# Altium PCB Power-PCB-v1.0.PcbDoc (part 3 of 3)
Units mil, origin at the board's own origin, x right, y up, seen from the top; angles counter-clockwise.
Board outline 5472.44 x 5472.44 mil, 2 copper layers (Top Layer, Bottom Layer), stack 61.855 mil thick; 76 components, 43 nets, 196 pads, 129 vias.
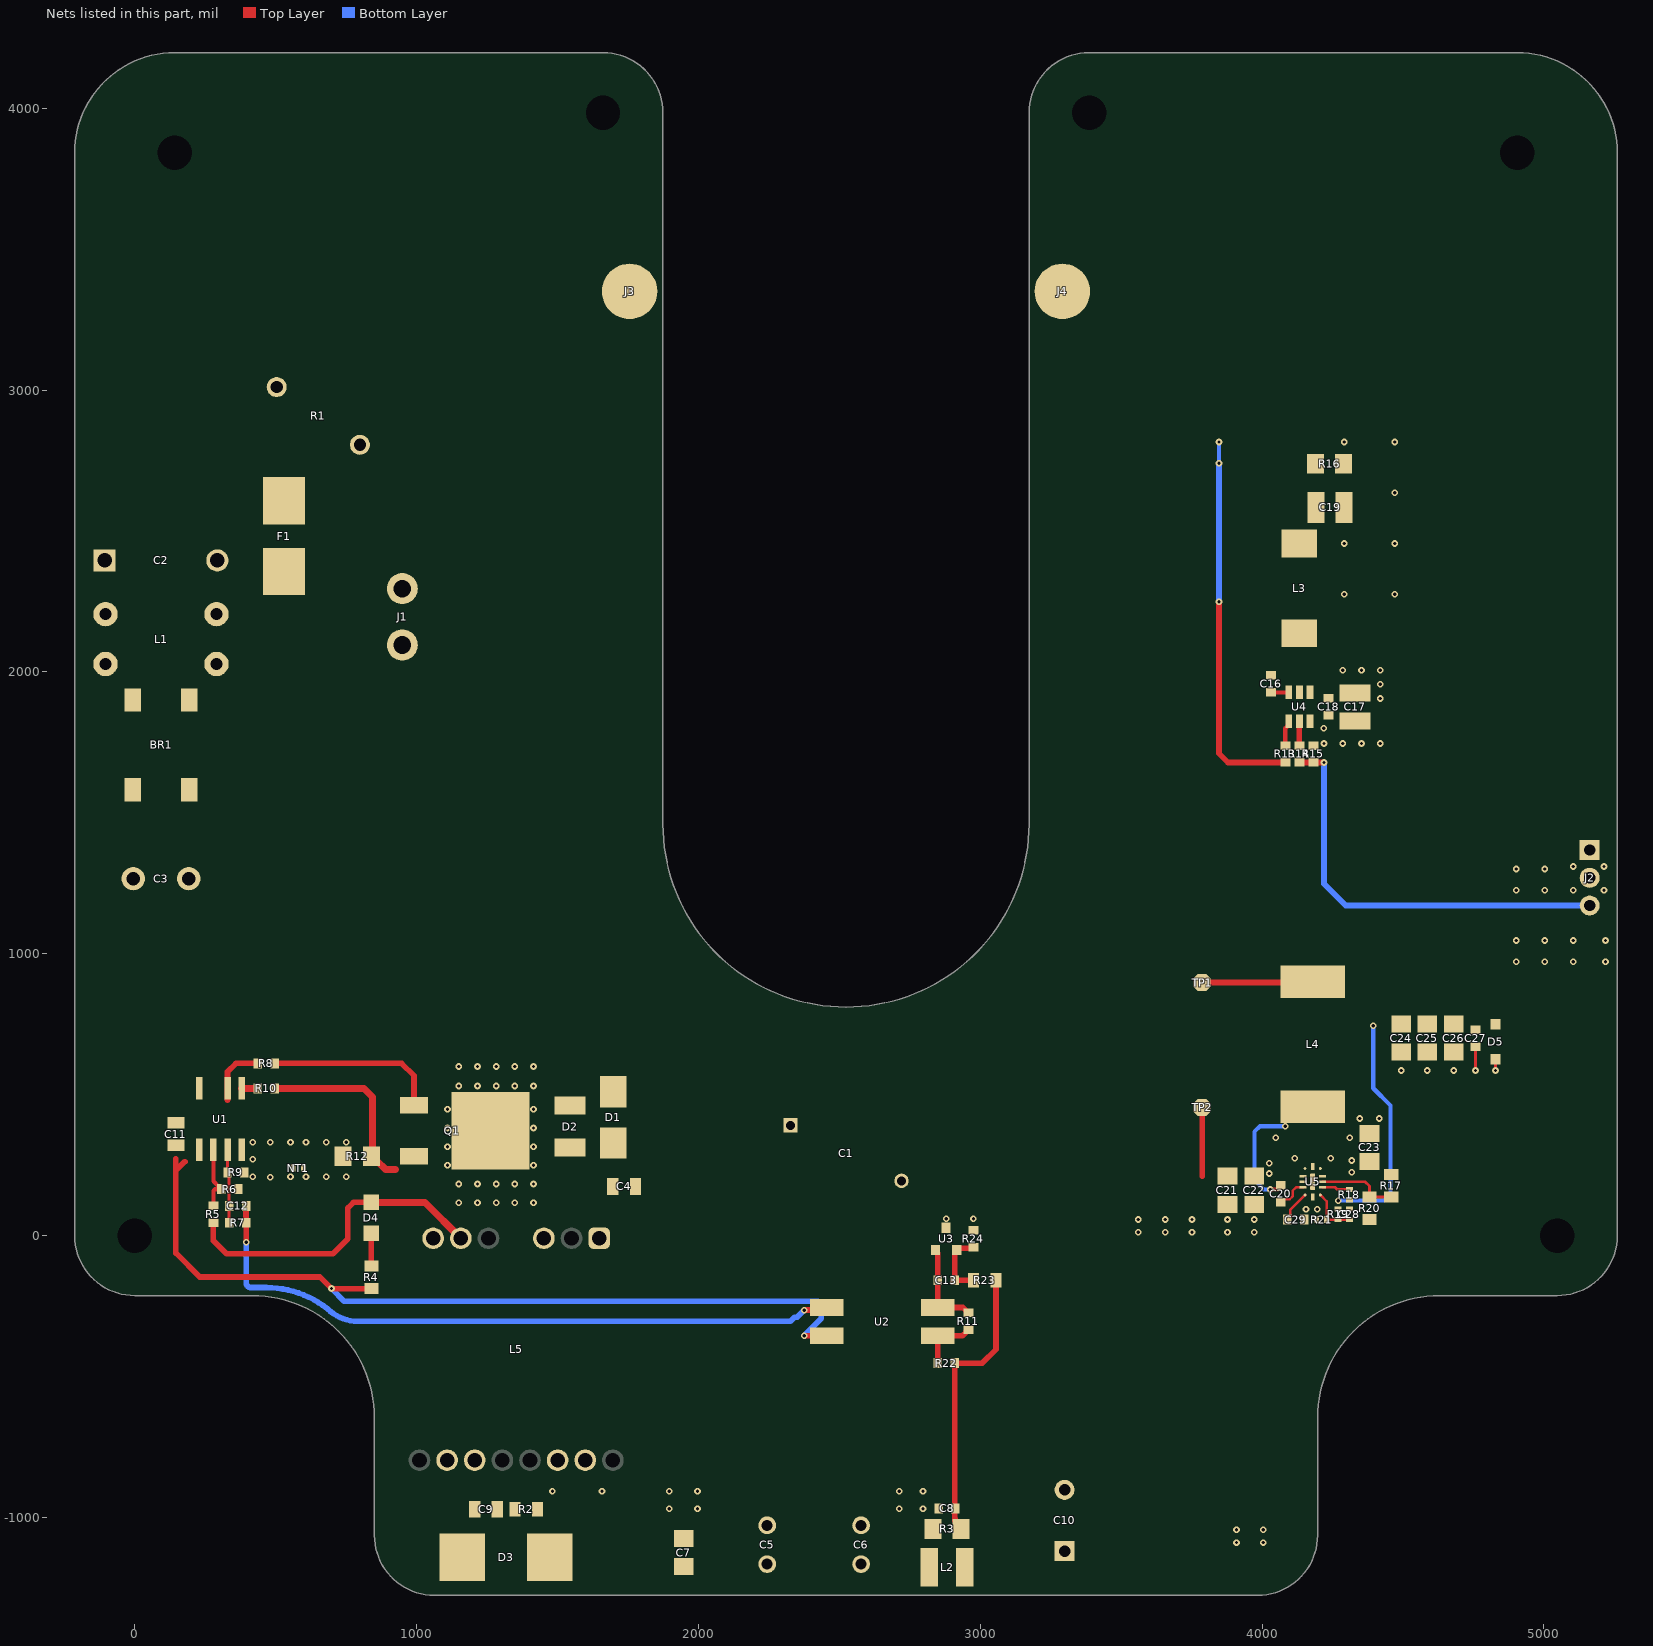
[diagram p2: the nets of this part, all layers, seen from the top]

## Part data (continued)
U1: "IC OFFLINE SWITCH FLYBACK 7SOIC", LCSC Part Number=C182073, Manufacturer="Texas Instruments", ComponentLink1Description=https://datasheet.ciiva.com/24018/slusbf3a-284800-24018902.pdf?src-supplier=Mouser, ComponentLink1URL=https://datasheet.ciiva.com/24018/slusbf3a-284800-24018902.pdf?src-supplier=Mouser, ComponentLink2Description=https://datasheet.ciiva.com/30018/ucc28740-30018278.pdf?src-supplier=Avnet, ComponentLink2URL=https://datasheet.ciiva.com/30018/ucc28740-30018278.pdf?src-supplier=Avnet, ComponentLink3Description=https://datasheet.ciiva.com/29610/ucc28740-29610346.pdf?src-supplier=Digikey, ComponentLink3URL=https://datasheet.ciiva.com/29610/ucc28740-29610346.pdf?src-supplier=Digikey, Height=1.75mm, Item Type=IC, Lead Free=5697LeadFree, Length=4.9mm, Manufacturer Part Number=UCC28740DR, Pricing="1=1.11, 10=0.8, 50=0.723, 100=0.638, 1000=0.532, 10000=0.496 (USD)", RoHS=Yes, Stock=12848, Supplier=Mouser, Thickness=1.58mm, Width=3.91mm
U2: "OPTOISOLATOR 5KV 1CH TRANS 4-SMD", Case/Package=SMD/SMT, Collector Emitter Saturation Voltage=200mV, Collector Emitter Voltage (VCEO)=35V, Current Transfer Ratio=400%, Forward Current=50mA, Forward Voltage=1.4V, Isolation Voltage=5kV, LCSC Part Number=C109227, Manufacturer="Vishay Lite-On", Max Operating Temperature=110°C, Max Power Dissipation=200mW, Min Operating Temperature=-30°C, Package Quantity=1000, Power Dissipation=70mW, Reverse Breakdown Voltage=6V, Collector-emitter Voltage-Max=200mV, ComponentLink1Description=https://datasheet.ciiva.com/12240/ltv-817-827-847-12240648.pdf?src-supplier=Mouser, ComponentLink1URL=https://datasheet.ciiva.com/12240/ltv-817-827-847-12240648.pdf?src-supplier=Mouser, ComponentLink2Description=https://datasheet.ciiva.com/2958/s-110-ltv-817m-s-s-ta-s-ta1-s-tpseries20130925-2958797.pdf?src-supplier=Digikey, ComponentLink2URL=https://datasheet.ciiva.com/2958/s-110-ltv-817m-s-s-ta-s-ta1-s-tpseries20130925-2958797.pdf?src-supplier=Digikey, Fall Time=18000ns, Input Type=DC, Isolation Voltage-Max=5kV, Item Type=Optocouplers, Lead Free="Lead Free", Manufacturer Part Number=LTV-817S-TA1-C, Max Collector Current=50mA, Max Input Current=50mA, Max Output Voltage=35V, Mounting Technology="Surface Mount", Number of Channels=1, Number of Elements=1, Output Current per Channel=50mA, Packaging="Tape and Reel", Pins=4, Pricing="1=0.5, 10=0.291, 100=0.1856, 500=0.14438 (USD)", Radiation Hardening=No, Rise Time=18000ns, RoHS=Yes, Series=-, Stock=4949, Supplier=Digikey
U3: "IC VREF SHUNT ADJ 0.5% SOT23-3", Case/Package=SOT-23-3, Cathode Current=700uA, LCSC Part Number=C2864384, Manufacturer="Texas Instruments", Max Operating Temperature=125°C, Max Output current=100mA, Max Output Voltage=36V, Max Supply Voltage=37V, Min Operating Temperature=-40°C, Min Output Voltage=2.495V, Package Quantity=250, Temperature Coefficient=92ppm/°C, Tolerance=0.5%, ComponentLink1Description=https://datasheet.ciiva.com/15148/getdatasheetpartid-48480-15148279.pdf?src-supplier=Verical, ComponentLink1URL=https://datasheet.ciiva.com/15148/getdatasheetpartid-48480-15148279.pdf?src-supplier=Verical, ComponentLink2Description=https://datasheet.ciiva.com/2012/tl431a-2012112.pdf?src-supplier=Digikey, ComponentLink2URL=https://datasheet.ciiva.com/2012/tl431a-2012112.pdf?src-supplier=Digikey, ComponentLink3Description=https://datasheet.ciiva.com/2012/tl431a-2012111.pdf?src-supplier=Digikey, ComponentLink3URL=https://datasheet.ciiva.com/2012/tl431a-2012111.pdf?src-supplier=Digikey, ComponentLink4Description=https://datasheet.ciiva.com/2012/tl431a-2012113.pdf?src-supplier=Digikey, ComponentLink4URL=https://datasheet.ciiva.com/2012/tl431a-2012113.pdf?src-supplier=Digikey, ComponentLink5Description=https://datasheet.ciiva.com/14366/tl432b-14366103.pdf?src-supplier=Avnet, ComponentLink5URL=https://datasheet.ciiva.com/14366/tl432b-14366103.pdf?src-supplier=Avnet, Item Type=IC, Lead Free="Lead Free", Manufacturer Part Number=TL431BQDBZT, Output Current=100mA, Output Type=Adjustable, Output Voltage=36V, Packaging="Tape and Reel", Pins=3, Pricing="1=0.88, 10=0.633, 50=0.57, 100=0.501, 1000=0.415, 10000=0.397 (USD)", Radiation Hardening=No, Reference Type=Shunt,Adjustable, Reference Voltage=36V, RoHS=Yes, RoHS Compliant=Yes, Series=-, Stock=34135, Supplier=Mouser, Thickness=1mm
U4: "IC LED DRV RGLTR PWM SOT23-THIN", LCSC Part Number=C2865497, Manufacturer="Texas Instruments", Height=1.1mm, Item Type=IC, Length=2.9mm, Manufacturer Part Number=TPS92200D2DDCR, Pins=6NUMBER, Pricing="1=0.59, 10=0.414, 50=0.371, 100=0.323, 1000=0.276, 10000=0.243 (USD)", RoHS=Yes, Stock=5302, Supplier=Mouser, Thickness=870um, Width=1.6mm
U5: "IC REG BUCK ADJ 4A 13WQFN", LCSC Part Number=C3187981, Manufacturer="Texas Instruments", Item Type=IC, Manufacturer Part Number=LM60440AQRPKRQ1, Pricing="1=2.79, 10=1.91, 50=1.91, 100=1.71, 1000=1.52, 10000=1.45 (USD)", RoHS=Yes, Stock=916, Supplier=Mouser

## Free pads (board coordinates)
  oval 60x0 / inner round 60 / far side oval 60x0 hole 122.05: 4(141.73,3842.52)
  round 0 / inner oval 60x0 / far side round 0 hole 122.05: 5(1661.42,3984.25)
  round 0 / inner round 60 / far side oval 60x0 hole 122.05: 6(0,0)
  round 0 / inner round 60 / far side round 0 hole 122.05: 7(3385.98,3984.25) 8(4905.08,3842.52) 9(5047.24,0)

## Via types
v1: diameter 23.62, hole 11.81, Top Layer to Bottom Layer, tented both sides, 129 vias

## Nets (pads, with @x,y where several pads share a name; then routed paths per layer and width w, separated by ;. In a path a pad name is that pad's centre, name@x,y a point inside that pad or via, vN(x,y) a via of type N, cw(c..) or ccw(c..) an arc to the next point about the centre after c; other vN are vias at no path point)
5V: C24.2 C25.2 C26.2 C27.2 C28.2 D5.2 J2.1 L4.2 R18.1 R19.2 TP1.1 | length 1207.1
  Top Layer w20: TP1.1@3787.03,898.05 L4.2@4177.33,898.05
  Bottom Layer w15: v1(4269.65,124.43) 4430.42,124.43 4455.03,149.05 4455.03,462.05 4394.03,523.05 v1(4394.03,745.05)
24V: C8.2 C10.1 C17.2 C18.2 C21.2 C22.2 C23.2 L2.2 R3.2 R17.2 R22.2 R23.2 TP2.1 U4.4 U5.2 U5.10 | length 1302.5
  Top Layer w20: R3.2@2909.03,-1010.43 R22.2@2909.03,-451.95 3007.03,-451.95 3055.68,-403.3 R23.2@3055.68,-157.95 ; 2909.03,-987.79 ccw(c2987.56,-987.79) 2932.03,-1043.31 R3.2@2913.53,-1024.81 ; 3787.03,211.05 TP2.1@3787.03,455.05
  other v1: 3561.03,12.05 3656.03,12.05 3751.03,12.05 3561.03,57.23 3656.03,57.23 3751.03,57.23 4025.01,220.43 4317.54,224.52 4025.01,256.52 4317.54,266.52 4419.03,1906.05 4419.03,1956.05 4286.03,2006.05 4352.53,2006.05 4419.03,2006.05
FB_O: C12.1 R7.1 U2.3 | length 2391.6
  Top Layer w20: C12.1@395.03,105.8 R7.1@395.03,45.8 396.03,44.8 v1(396.03,-23.61) ; v1(2375.03,-264.33) 2375.72,-263.64 2446.65,-263.64 U2.3@2455.33,-254.95
  Bottom Layer w20: v1(396.03,-23.61) 396.03,-168.38 ccw(c411.54,-168.38) 411.54,-183.89 466.75,-183.89 cw(c464.69,-541.22) 683.88,-259.01 cw(c674.66,-270.85) 685.2,-260.17 ccw(c790.93,-153.23) 790.99,-303.62 2326.37,-303.62 2340.78,-289.21 2350.16,-289.21 v1(2375.03,-264.33)
GND: C1.2 C5.2 C6.2 C7.1 C8.1 C10.2 C17.1 C18.1 C19.1 C21.1 C22.1 C23.1 C24.1 C25.1 C26.1 C27.1 C29.1 D5.1 J2.2 L5.12 L5.13 R15.2 R16.1 R20.1 R21.1 R24.1 U3.3 U4.3 U5.1 U5.6 U5.11 U5.13 | length 127.1
  Top Layer w10: C8.1@2850.46,-968.74 C8.1@2852.03,-970.31 ; v1(4757.03,586.05) C27.1@4757.03,671.05 ; v1(4828.03,586.05) D5.1@4828.03,625.89
  other v1: 3909.06,-1088.82 4004.06,-1088.82 3909.06,-1043.64 4004.06,-1043.64 1896.03,-968.74 1997.03,-968.74 2712.03,-968.74 2796.85,-968.74 1482.03,-907.06 1658.16,-907.06 1896.03,-907.06 1997.03,-907.06 2712.03,-907.06 2796.85,-907.06 3877.03,12.05 3972.03,12.05 3877.03,57.23 3972.03,57.23 2879.03,60.05 2975.68,60.05 4155.86,93.29 4195.89,93.29 4115.37,275.04 4243.59,275.05 4048.03,348.05 4310.93,348.05 4346.03,416.05 4416.03,416.05 4494.03,586.05 4586.03,586.05 4680.03,586.05 4901.44,971.76 5002.44,971.76 5103.44,971.76 5218.11,971.76 4901.44,1047.46 5002.44,1047.46 5103.44,1047.46 5218.11,1047.46 4901.44,1225.49 5002.44,1225.49 5103.94,1225.49 5213.19,1225.49 4901.44,1301.19 5002.44,1301.19 5103.94,1310.05 5213.19,1310.05 4219.53,1746.05 4286.03,1746.05 4352.53,1746.05 4419.03,1746.05 4218.53,1800.46 4290.85,2275.5 4471.03,2275.5 4290.85,2455.68 4471.03,2455.68 4471.03,2635.87 4290.85,2816.05 4471.03,2816.05
HV_DC: BR1.1 C3.1 C4.2 D1.1 L5.1 U1.7
LED_OUT_N: J4.1 R13.2 R16.2 | length 1353.6
  Top Layer w20: v1(3847.03,2249.05) 3847.03,1711.05 3879.03,1679.05 R13.2@4082.43,1679.05
  Bottom Layer w15: v1(3847.03,2741.05) v1(3847.03,2816.05)
  Bottom Layer w20: v1(3847.03,2249.05) v1(3847.03,2741.05)
LED_OUT_P: C19.2 J3.1 L3.2
Live: F1.1 J1.2
NetBR1_3: BR1.3 L1.4
NetBR1_4: BR1.4 L1.3
NetC2_1: C2.1 L1.2 R1.2
NetC2_2: C2.2 F1.2 L1.1
NetC4_1: C4.1 D1.2 D2.1
NetC5_1: C5.1 C6.1 C7.2 D3.1 L2.1 R2.2 R3.1
NetC9_1: C9.1 D3.2 L5.8 L5.9
NetC9_2: C9.2 R2.1
NetC12_2: C12.2 R7.2 R9.2 U1.3 | length 261.1
  Top Layer w10: U1.3@329.31,304.5 R9.2@329.31,224.5 335.03,218.77 C12.2@335.03,105.8 R7.2@335.03,45.8
NetC13_1: C13.1 R11.1 U2.2 U3.1 | length 326
  Top Layer w20: U3.1@2839.63,-50.69 2839.63,-52.66 2849.03,-62.06 C13.1@2849.03,-157.95 U2.2@2849.03,-254.95 2938.09,-254.95 2950.68,-267.55 2950.68,-268.95 2955.68,-273.95 R11.1@2958.18,-273.95
NetC13_2: C13.2 R23.1 R24.2 U3.2 | length 239.3
  Top Layer w20: U3.2@2914.43,-50.69 2909.03,-56.09 C13.2@2909.03,-157.95 R23.1@2975.68,-157.95 ; U3.2@2916.43,-50.69 2922.54,-44.58 2972.42,-44.58 R24.2@2975.68,-41.32
NetC16_1: C16.1 U4.6 | length 62.6
  Top Layer w15: C16.1@4032.03,1927.62 U4.6@4094.63,1927.62
NetC16_2: C16.2 L3.1 U4.5
NetC20_1: C20.1 L4.1 U5.3 U5.12 | length 404.2
  Top Layer w15: v1(4029.03,164.05) 4029.34,164.36 4056.03,164.36 4066.03,174.36 C20.1@4066.03,179.05
  Bottom Layer w15: v1(4029.03,164.05) 4006.03,164.05 3973.03,197.05 3973.03,369.05 3992.03,388.05 v1(4081.69,388.05)
NetC20_2: C20.2 U5.4 | length 112.5
  Top Layer w9: C20.2@4066.03,119.05 4076.34,129.36 4097.97,129.36 4108.16,139.55 4108.16,159.5 4120.26,171.6 4144.95,171.6 U5.4@4145.03,171.68
NetC28_1: C28.1 R19.1 R21.2 U5.7 | length 176.8
  Top Layer w9: U5.7@4206.79,144.36 4229.36,121.8 R21.2@4229.36,57.23 C28.1@4309.65,57.23
NetC29_2: C29.2 U5.5 | length 113.1
  Top Layer w9: C29.2@4089.48,57.23 4099.98,67.73 4099.98,92.18 U5.5@4152.17,144.36
NetD2_2: D2.2 L5.3 Q1.2
  other v1: 1150.09,117.11 1216.32,117.11 1282.56,117.11 1348.79,117.11 1415.03,117.11 1150.09,183.35 1216.32,183.35 1282.56,183.35 1348.79,183.35 1415.03,183.35 1110.03,249.58 1415.03,249.58 1110.03,315.82 1415.03,315.82 1110.03,382.06 1415.03,382.06 1110.03,448.29 1415.03,448.29 1150.09,531.29 1216.32,531.29 1282.56,531.29 1348.79,531.29 1415.03,531.29 1150.09,600.29 1216.32,600.29 1282.56,600.29 1348.79,600.29 1415.03,600.29
NetD4_1: D4.1 L5.5 R5.2 | length 1152.8
  Top Layer w20: R5.2@279.31,45.8 279.31,-17.92 325.6,-64.21 703.35,-64.21 756.5,-11.06 756.5,98.19 776.42,118.11 D4.1@839.44,118.11
  Top Layer w25: D4.1@839.44,118.11 1029.68,118.11 L5.5@1156.98,-9.19
NetD4_2: D4.2 R4.2 | length 115.5
  Top Layer w20: R4.2@839.44,-107.61 D4.2@839.44,7.88
NetQ1_1: Q1.1 R8.2 | length 617.6
  Top Layer w20: R8.2@496.45,611.39 947.03,611.39 990.7,567.72 Q1.1@990.7,462.49
NetQ1_3: Q1.3 R10.2 R12.2 | length 631.8
  Top Layer w25: R10.2@496.45,522.8 813.16,522.8 843.55,492.4 843.55,318.89 ; R12.2@843.55,277.55 855.82,265.28 859.67,265.28 889.41,235.55 924.76,235.55
NetR8_1: R8.1 U1.6 | length 219.5
  Top Layer w20: 329.31,481.46 U1.6@329.31,522.8 329.31,581.43 359.26,611.39 R8.1@436.45,611.39
NetR10_1: R10.1 U1.5 | length 57.1
  Top Layer w25: U1.5@379.31,522.8 R10.1@436.45,522.8
NetR11_2: R11.2 R22.1 U2.1 | length 216.3
  Top Layer w20: R22.1@2849.03,-451.95 U2.1@2849.03,-354.95 2937.18,-354.95 2950.68,-341.45 2950.68,-338.95 2955.68,-333.95 R11.2@2958.18,-333.95
NetR13_1: R13.1 U4.1 | length 90.5
  Top Layer w15: R13.1@4082.43,1739.05 4082.43,1800.46 4094.63,1812.66 U4.1@4094.63,1824.47
NetR14_2: R14.2 U4.2 | length 85.4
  Top Layer w20: R14.2@4132.03,1739.05 U4.2@4132.03,1824.47
NetR17_1: R17.1 R20.2 U5.9 | length 289.1
  Top Layer w10: U5.9@4213.93,191.36 4365.44,191.36 4381.03,175.78 R20.2@4381.03,137.23 R17.1@4458.03,137.23
NetR18_2: R18.2 U5.8 | length 98.7
  Top Layer w10: U5.8@4213.93,171.68 4258.35,171.68 4265.44,164.59 R18.2@4309.65,164.59
Neutral: J1.1 R1.1
P-SGND: C11.1 L5.6 NT1.1 R6.1 R9.1 U1.4
  other v1: 481.45,207 419.03,209.41 552.53,209.41 419.03,271.05 419.03,331.05 481.45,331.05 552.53,331.05
PGND: BR1.2 C1.1 C3.2 NT1.2 R12.1
  other v1: 607.53,209.41 679.28,209.41 751.03,209.41 607.53,331.05 679.28,331.05 751.03,331.05
PWM_CTRL: J2.3 R14.1 R15.1 | length 1492.7
  Top Layer w20: R14.1@4132.03,1679.05 v1(4219.53,1679.05)
  Bottom Layer w20: v1(4219.53,1679.05) 4219.53,1248.55 4296.72,1171.36 J2.3@5162.24,1171.36
VDD_M: C11.2 R4.1 U1.1 U2.4 | length 3102.8
  Top Layer w20: 146.03,231.05 177.21,262.23 178.46,262.23 ; 146.03,272.39 146.03,-61.8 230.76,-146.52 656.95,-146.52 v1(698.04,-187.61) R4.1@839.44,-187.61 ; v1(2375.03,-354.95) U2.4@2455.33,-354.95
  Bottom Layer w20: v1(698.04,-187.61) 742.95,-232.52 2424.32,-232.52 2436.03,-244.24 2436.03,-293.95 v1(2375.03,-354.95)
VS: R5.1 R6.2 U1.2 | length 194.9
  Top Layer w15: R5.1@279.31,105.8 279.31,159.45 285,165.15 R6.2@307.18,165.15 307.18,167.65 299.68,175.15 297.18,175.15 279.31,193.02 279.31,263.16
pads on no net: L5.2 L5.4 L5.7 L5.10 L5.11 L5.14

## Polygon pours and split planes (outlines as drawn)
NetC2_1 on Top Layer "NETC2_1_L01_P018" (solid, pour order 18): 579.03,2893.05 449.03,2893.05 21.94,2465.96 21.94,2338.05 -179.97,2338.05 -180.61,2426.25 -179.97,2515.75 359.33,3055.05 579.03,3055.05
GND on Top Layer "GND_L01_P024" (solid, remove dead copper, pour order 24): 3295.56,4194.65 3169.88,4068.97 3169.88,1361.37 cw(c2541.41,1472.31) 2836.31,906.34 2652.35,810.49 2652.35,-471.51 2523.23,-600.63 2523.23,-601.61 848.49,-601.61 847.97,-602.13 847.93,-601.61 847.93,-1145.91 975.54,-1273.51 975.54,-1275.59 4094.1,-1275.59 4235.83,-1130.79 4235.83,-483.5 4473.52,-245.81 5101.65,-230.13 5266.34,-99 5266.34,3982.79 5054.49,4194.65
LED_OUT_P on Top Layer "NONET_L01_P-001" (solid, pour order 23): 1624.04,3514.53 1875.42,3514.53 1875.42,1375.09 1882.44,1368.07 1888.96,1374.59 3168.54,1374.59 3168.54,2634.4 3174.63,2640.48 3176.41,2638.7 4222.25,2638.7 4222.25,2406.56 3421.38,2406.56 3421.38,1493.16 cw(c2506.5,1493.16) 1625.76,1245.5 1624.04,3429.95
HV_DC on Top Layer "HV_DC_L01_P002" (solid, pour order 2): 1533.12,729.05 1650.45,611.71 1650.45,414.24 1789.84,414.24 1812.03,392.05 1812.03,205.11 1756.44,205.11 1756.44,74.46 1741.03,59.05 1626.03,59.05 1609.54,42.56 1609.54,-101.95 1944.03,-101.95 1993.03,-52.95 1993.03,491.57 1428.56,1056.05 110.03,1056.05 73.03,1093.05 73.03,1623.15 -210.97,1623.15 -210.97,882.05 -57.97,729.05
NetD2_2 on Top Layer "NETD2_2_L01_P004" (solid, pour order 4): 1544.44,645.05 1600,589.49 1599.56,588.35 1599.56,414.24 1485.22,414.24 1441.54,370.55 1441.54,146.54 1502.2,85.88 1502.2,-101.95 1330.03,-101.95 1330.03,50.24 1298.82,81.46 1114.62,81.46 1094.03,102.05 1094.03,645.05
NetC20_1 on Top Layer "NETC20_1_L01_P009" (solid, pour order 9): 4172.59,233.06 4172.59,271.49 4064.91,379.17 4064.91,514.61 4294.05,514.61 4294.05,379.23 4186.37,271.55 4186.37,233.06
PGND on Top Layer "PGND_L01_P015" (solid, pour order 15): 139.77,1623.15 139.77,1131.31 1129.53,1131.31 1129.53,1623.15
NetC16_2 on Top Layer "NETC16_2_L01_P010" (solid, pour order 10): 4144.24,1903.61 4144.24,2044.25 4176.03,2076.05 4324.84,2076.05 4324.84,2192.05 3984.25,2192.05 3984.25,1989.82 4001.46,1972.62 4106.07,1972.62 4119.83,1958.87 4119.83,1903.61
5V on Top Layer "5V_L01_P000" (solid, pour order 0): 4850.03,716.05 4850.03,1307.05 4875.76,1332.77 5238.78,1332.77 5238.78,1444.05 4753.03,1444.05 4692.03,1383.05 4692.03,716.05
24V on Top Layer "24V_L01_P007" (solid, pour order 7): 4483.03,205.5 4201.03,205.5 4201.03,219.21 4243.59,219.21 4317.54,293.16 4483.03,293.16
24V on Top Layer "24V_L01_P005" (solid, pour order 5): 3623.03,275.05 3541.03,193.05 3541.03,-1012.95 3523.03,-1030.95 3348.03,-1030.95 3348.03,-1262.05 3697.94,-1262.05 3773.03,-1186.95 3773.03,139.05 3815.03,181.05 4012.03,181.05 4036.49,205.5 4157.93,205.5 4157.93,219.21 4158.03,219.31 4115.27,219.31 4059.53,275.05
GND on Bottom Layer "GND_L02_P026" (solid, pour order 26): 5057.19,4163.22 5068.25,4157.65 5072.54,4155.02 5083.9,4149.18 5087.89,4146.81 5089.74,4144.96 5142.78,4107.36 5156.06,4093.07 5175.37,4075.13 5214.87,4019.4 5244.96,3950.39 5259.84,3878.99 5259.84,3822.77 5259.84,-42.29 5227.48,-120.43 5171.03,-176.87 5119.46,-198.23 5047.24,-212.6 4592.02,-212.6 ccw(c4643.7,-669.15) 4195.47,-568.15 4195.47,-657.06 4196.85,-658.44 4196.85,-1105.28 4164.48,-1183.42 4104.68,-1243.22 4026.54,-1275.59 964.92,-1275.59 964.31,-1276.21 848.08,-1159.98 848.08,-603.47 847.39,-594.77 2514.41,-594.77 2521.26,-601.61 2650.2,-472.68 2650.2,821.12 2768.41,858.91 2912.33,931.24 3007.39,1027.09 3087.21,1137.59 3146.52,1277.73 3173.23,1416.39 3173.23,4036.59 3175.92,4039.28 3180.47,4039.28 3180.47,4079.56 3297.77,4196.85 4931.66,4196.85 4974.64,4190.04 5016.95,4179.89
PGND on Bottom Layer "PGND_L02_P025" (solid, remove dead copper, pour order 25): 593.11,1054.88 595.08,1056.85 1426.77,1056.85 2062.6,421.02 2360.83,421.02 2369.68,412.17 2369.69,353.11 1931.69,353.11 1588.19,696.61 591.14,696.61
24V on Bottom Layer "24V_L02_P017" (solid, pour order 17): 3992.03,275.05 3992.03,211.05 4017.03,186.05 4338.03,186.05 4369.03,217.05 4369.03,286.05 4289.03,286.05 4289.03,244.05 4066.03,244.05 4066.03,275.05
P-SGND on Bottom Layer "P-SGND_L02_P016" (solid, pour order 16): 385.03,372.05 385.03,84.05 574.03,-104.95 1103.03,-104.95 1103.03,35.2 1053.03,35.2 1053.03,175.05 587.03,175.05 569.03,193.05 569.03,372.05
NetD2_2 on Bottom Layer "NETD2_2_L02_P003" (solid, pour order 3): 1086.03,643.46 1086.03,91.3 1311.61,91.3 1324.03,78.88 1324.03,-100.63 1501.03,-100.63 1501.03,643.46

## Other copper
Top Layer:
  rectangle net Live: 686.61,2022.4 1026.18,2175.94
  rectangle net Live: 669.88,2022.4 798.82,2548.98
  rectangle net Neutral: 871.65,2227.13 1027.16,2744.84
  region net GND: 4135.76,228.52 4163.26,256.02 3971.63,447.64 3944.13,420.14
  region net GND: 4414.83,420.15 4387.33,447.65 4195.7,256.02 4223.2,228.52
  rectangle net GND: 4170.62,103.23 4188.34,220.57
  rectangle net LED_OUT_N: 3187.46,2703.65 3402.46,3514.53
  rectangle net LED_OUT_N: 3187.46,2704.05 4219.03,2923.05
  rectangle net 24V: 4157.23,1891.05 4437.03,2025.05
  rectangle net 24V: 2897.03,-1261.06 3365.03,-1030.95
  rectangle net 24V: 2897.03,-1261.06 2976.52,-969.55
  rectangle net NetC5_1: 2783.62,-1246.1 2883.44,-1003.21
  rectangle net NetC5_1: 1392.2,-1260.08 2882.03,-1133.06
  rectangle net NetC5_1: 1392.2,-1260.08 1553.61,-940.64
  rectangle net NetC9_2: 1266.39,-1004.41 1369.44,-939.41
  rectangle net NetC9_1: 1069.98,-1260.3 1242.59,-747.95
  rectangle net 5V: 4064.91,716.05 4850.03,957.76
  rectangle net 5V: 4257.15,85.23 4322.15,136.59
  rectangle net NetC20_1: 4048.53,151.89 4083.53,196.3
  rectangle net NetC20_1: 4058.53,186.3 4157.87,196.3
  rectangle net P-SGND: 116.03,380.39 570.53,420.39
  rectangle net HV_DC: 205.03,439.05 254.03,992.05
  rectangle net PGND: 589.53,145.67 769.44,344.26
  region net P-SGND: 570.53,147.65 570.53,385.6 359.31,385.6 359.31,147.65
  rectangle net NetC4_1: 1489.32,231.06 1744.94,343.37
  rectangle net NetC4_1: 1489.32,145.11 1716.44,384.71
  rectangle net NetQ1_3: 804.44,222.39 1045.09,331.39
  region net VDD_M: 240.88,221.05 240.88,340.39 116.03,340.39 116.03,221.05
  region net PGND: 338.77,1623.15 139.77,1623.15 139.77,1219.05 338.77,1219.05
  rectangle net HV_DC: -151.97,1219.05 47.03,1623.15
  region net NetBR1_3: 368.77,2084.05 164.86,2084.05 164.86,1859.37 368.77,1859.37
  rectangle net NetBR1_4: -181.97,1859.37 21.94,2084.05
  rectangle net NetC2_1: -180.67,2127.05 21.94,2515.05
  rectangle net NetC2_2: 165.03,2127.05 368.03,2471.05
  rectangle net NetC2_2: 213.03,2273.05 605.03,2471.05
  region net Neutral: 1027.17,2737.05 1027.17,2893.05 690.03,2893.05 690.03,2737.05
  rectangle net Live: 455.03,2524.05 799.03,2701.05
  pour cut-out: 4937.01,0 ccw(c5047.25,0) 5047.25,-110.24 ccw(c5047.25,0) 5157.48,0 ccw(c5047.25,0) 5047.25,110.24 ccw(c5047.25,0)
  pour cut-out: 4794.86,3842.52 ccw(c4905.1,3842.52) 4905.1,3732.28 ccw(c4905.1,3842.52) 5015.33,3842.52 ccw(c4905.1,3842.52) 4905.1,3952.76 ccw(c4905.1,3842.52)
  pour cut-out: 3275.73,3984.25 ccw(c3385.97,3984.25) 3385.97,3874.02 ccw(c3385.97,3984.25) 3496.2,3984.25 ccw(c3385.97,3984.25) 3385.97,4094.49 ccw(c3385.97,3984.25)
  pour cut-out: 2769.03,-215.43 2769.03,-394.48 2950.15,-394.48 2985.68,-358.95 2985.68,-248.95 2952.15,-215.43 2918.09,-215.43
Bottom Layer:
  rectangle net NetD2_2: 1086.03,95.29 1441.03,556.29
  rectangle net 24V: 3541.03,1891.05 4437.03,2025.05
  rectangle net 24V: 3541.03,-8.95 3773.03,2022.05
  rectangle net P-SGND: 952.03,-104.95 1103.03,6.05
  rectangle net P-SGND: 747.03,-104.95 1053.03,175.05
  rectangle net PGND: 140.03,1159.05 849.03,1373.05
  rectangle net PGND: 591.03,193.05 849.03,1310.05
  pour cut-out: 4937.01,0 ccw(c5047.25,0) 5047.25,-110.24 ccw(c5047.25,0) 5157.48,0 ccw(c5047.25,0) 5047.25,110.24 ccw(c5047.25,0)
  pour cut-out: 4794.86,3842.52 ccw(c4905.1,3842.52) 4905.1,3732.28 ccw(c4905.1,3842.52) 5015.33,3842.52 ccw(c4905.1,3842.52) 4905.1,3952.76 ccw(c4905.1,3842.52)
  pour cut-out: 3275.73,3984.25 ccw(c3385.97,3984.25) 3385.97,3874.02 ccw(c3385.97,3984.25) 3496.2,3984.25 ccw(c3385.97,3984.25) 3385.97,4094.49 ccw(c3385.97,3984.25)

## Silkscreen, mask and mechanical layers (free items; w line width, h text height)
Top Overlay:
  circle w3.94: c141.74,3842.52 r110.24
  circle w3.94: c0,0 r110.24
  circle w3.94: c5047.25,0 r110.24
  circle w3.94: c4905.1,3842.52 r110.24
  circle w3.94: c3385.97,3984.25 r110.24
  circle w3.94: c1661.42,3984.25 r110.24
  lines w5: 1154.86,2005.96 1508.29,2005.96 ; 1154.86,2407.54 1508.29,2407.54 ; 4758.46,1072.93 5070.71,1072.93 ; 4758.46,1466.63 5070.71,1466.63
  text "+" at 1729.67,3124.69 h78.74
  text "-" at 3265.1,3124.69 h78.74
  text "NTRL" at 1194.94,2283.14 h47.24
  text "LIVE" at 1198.89,2081.46 h47.24
  text "AC PWR IN" at 1510.89,2005.96 h59.06 r90
  text "5V0" at 4863.04,1363.63 h47.24
  text "GND" at 4863.04,1246.17 h47.24
  text "CTRL" at 4863.04,1133.78 h47.24
  text "PWR IN" at 4829.04,1072.93 h78.74 r90
  text "5v0" at 3823.03,682.79 h78.74 r90
  text "24v" at 3824.03,492.05 h78.74 r90
Bottom Overlay:
  text "Rev-v1.0" at 3941.5,-1172.47 h59.06
Dimension:
  circle w0.5: c3385.83,3984.25 r59.06
  circle w0.5: c3385.83,3984.25 r59.06
  circle w0.5: c4905.51,3842.52 r59.06
  circle w0.5: c4905.51,3842.52 r59.06
  circle w0.5: c4905.51,3842.52 r59.06
  circle w0.5: c4905.51,3842.52 r59.06
  circle w0.5: c141.73,3842.52 r59.06
  circle w0.5: c141.73,3842.52 r59.06
  circle w0.5: c141.73,3842.52 r59.06
  circle w0.5: c141.73,3842.52 r59.06
  circle w0.5: c3385.83,3984.25 r59.06
  circle w0.5: c1661.42,3984.25 r59.06
  circle w0.5: c1661.42,3984.25 r59.06
  circle w0.5: c3385.83,3984.25 r59.06
  circle w0.5: c1661.42,3984.25 r59.06
  circle w0.5: c1661.42,3984.25 r59.06
  circle w0.5: c5047.24,0 r59.06
  circle w0.5: c5047.24,0 r59.06
  circle w0.5: c5047.24,0 r59.06
  circle w0.5: c5047.24,0 r59.06
  circle w0.5: c0,0 r59.06
  circle w0.5: c0,0 r59.06
  circle w0.5: c0,0 r59.06
  circle w0.5: c0,0 r59.06
Board Outline:
  circle w0.5: c1755.91,3350.4 r39.37
  circle w0.5: c1755.91,3350.4 r39.37
  circle w0.5: c1755.91,3350.4 r39.37
  circle w0.5: c1755.91,3350.4 r39.37
  circle w0.5: c3291.34,3350.4 r39.37
  circle w0.5: c3291.34,3350.4 r39.37
  circle w0.5: c3291.34,3350.4 r39.37
  circle w0.5: c3291.34,3350.4 r39.37
  lines w0.5: -212.6,0 ccw(c0,0) 0,-212.6 ; -212.6,0 ccw(c0,0) 0,-212.6 ; -212.6,0 ccw(c0,0) 0,-212.6 ; -212.6,0 ccw(c0,0) 0,-212.6 ; -212.6,0 -212.6,3842.52 ; -212.6,0 -212.6,3842.52 ; -212.6,0 -212.6,3842.52 ; -212.6,0 -212.6,3842.52 ; -212.6,3842.52 cw(c141.73,3842.52) 141.73,4196.85 ; -212.6,3842.52 cw(c141.73,3842.52) 141.73,4196.85 ; -212.6,3842.52 cw(c141.73,3842.52) 141.73,4196.85 ; -212.6,3842.52 cw(c141.73,3842.52) 141.73,4196.85 ; 0,-212.6 417.32,-212.6 ; 0,-212.6 417.32,-212.6 ; 0,-212.6 417.32,-212.6 ; 0,-212.6 417.32,-212.6 ; 141.73,4196.85 1661.42,4196.85 ; 141.73,4196.85 1661.42,4196.85 ; 141.73,4196.85 1661.42,4196.85 ; 141.73,4196.85 1661.42,4196.85 ; 417.32,-212.6 cw(c417.32,-645.67) 850.39,-645.67 ; 417.32,-212.6 cw(c417.32,-645.67) 850.39,-645.67 ; 417.32,-212.6 cw(c417.32,-645.67) 850.39,-645.67 ; 417.32,-212.6 cw(c417.32,-645.67) 850.39,-645.67 ; 850.39,-1062.99 ccw(c1062.99,-1062.99) 1062.99,-1275.59 ; 850.39,-1062.99 ccw(c1062.99,-1062.99) 1062.99,-1275.59 ; 850.39,-1062.99 ccw(c1062.99,-1062.99) 1062.99,-1275.59 ; 850.39,-1062.99 ccw(c1062.99,-1062.99) 1062.99,-1275.59 ; 850.39,-1062.99 850.39,-645.67 ; 850.39,-1062.99 850.39,-645.67 ; 850.39,-1062.99 850.39,-645.67 ; 850.39,-1062.99 850.39,-645.67 ; 1062.99,-1275.59 3984.25,-1275.59 ; 1062.99,-1275.59 3984.25,-1275.59 ; 1062.99,-1275.59 3984.25,-1275.59 ; 1062.99,-1275.59 3984.25,-1275.59 ; 1661.42,4196.85 cw(c1661.42,3984.25) 1874.02,3984.25 ; 1661.42,4196.85 cw(c1661.42,3984.25) 1874.02,3984.25 ; 1661.42,4196.85 cw(c1661.42,3984.25) 1874.02,3984.25 ; 1661.42,4196.85 cw(c1661.42,3984.25) 1874.02,3984.25 ; 1874.02,1460.63 ccw(c2523.62,1460.63) 3173.23,1460.63 ; 1874.02,1460.63 ccw(c2523.62,1460.63) 3173.23,1460.63 ; 1874.02,1460.63 ccw(c2523.62,1460.63) 3173.23,1460.63 ; 1874.02,1460.63 ccw(c2523.62,1460.63) 3173.23,1460.63 ; 1874.02,1460.63 1874.02,3984.25 ; 1874.02,1460.63 1874.02,3984.25 ; 1874.02,1460.63 1874.02,3984.25 ; 1874.02,1460.63 1874.02,3984.25 ; 3173.23,1460.63 3173.23,3984.25 ; 3173.23,1460.63 3173.23,3984.25 ; 3173.23,1460.63 3173.23,3984.25 ; 3173.23,1460.63 3173.23,3984.25 ; 3173.23,3984.25 cw(c3385.83,3984.25) 3385.83,4196.85 ; 3173.23,3984.25 cw(c3385.83,3984.25) 3385.83,4196.85 ; 3173.23,3984.25 cw(c3385.83,3984.25) 3385.83,4196.85 ; 3173.23,3984.25 cw(c3385.83,3984.25) 3385.83,4196.85 ; 3385.83,4196.85 4905.51,4196.85 ; 3385.83,4196.85 4905.51,4196.85 ; 3385.83,4196.85 4905.51,4196.85 ; 3385.83,4196.85 4905.51,4196.85 ; 3984.25,-1275.59 ccw(c3984.25,-1062.99) 4196.85,-1062.99 ; 3984.25,-1275.59 ccw(c3984.25,-1062.99) 4196.85,-1062.99 ; 3984.25,-1275.59 ccw(c3984.25,-1062.99) 4196.85,-1062.99 ; 3984.25,-1275.59 ccw(c3984.25,-1062.99) 4196.85,-1062.99 ; 4196.85,-1062.99 4196.85,-645.67 ; 4196.85,-1062.99 4196.85,-645.67 ; 4196.85,-1062.99 4196.85,-645.67 ; 4196.85,-1062.99 4196.85,-645.67 ; 4196.85,-645.67 cw(c4629.92,-645.67) 4629.92,-212.6 ; 4196.85,-645.67 cw(c4629.92,-645.67) 4629.92,-212.6 ; 4196.85,-645.67 cw(c4629.92,-645.67) 4629.92,-212.6 ; 4196.85,-645.67 cw(c4629.92,-645.67) 4629.92,-212.6 ; 4629.92,-212.6 5047.24,-212.6 ; 4629.92,-212.6 5047.24,-212.6 ; 4629.92,-212.6 5047.24,-212.6 ; 4629.92,-212.6 5047.24,-212.6 ; 4905.51,4196.85 cw(c4905.51,3842.52) 5259.84,3842.52 ; 4905.51,4196.85 cw(c4905.51,3842.52) 5259.84,3842.52 ; 4905.51,4196.85 cw(c4905.51,3842.52) 5259.84,3842.52 ; 4905.51,4196.85 cw(c4905.51,3842.52) 5259.84,3842.52 ; 5047.24,-212.6 ccw(c5047.24,0) 5259.84,0 ; 5047.24,-212.6 ccw(c5047.24,0) 5259.84,0 ; 5047.24,-212.6 ccw(c5047.24,0) 5259.84,0 ; 5047.24,-212.6 ccw(c5047.24,0) 5259.84,0 ; 5259.84,0 5259.84,3842.52 ; 5259.84,0 5259.84,3842.52 ; 5259.84,0 5259.84,3842.52 ; 5259.84,0 5259.84,3842.52
  lines w5: -128.98,1741.26 cw(c-99.46,1741.26) -99.46,1770.79 301.14,1770.79 cw(c301.14,1741.26) 330.66,1741.26 ; -128.98,1741.26 ccw(c-99.46,1741.26) -99.46,1711.73 301.14,1711.73 ccw(c301.14,1741.26) 330.66,1741.26 ; -128.98,1741.26 -128.98,1741.26 ; 330.66,1741.26 330.66,1741.26

## Text inside footprints (layer, text, board x,y; h text height)
L1: Top Overlay "1" at 225.4,2231.38 h39.37 r180
L5: Top Overlay "14" at 1677.67,-679.89 h39.37 r270; Top Overlay "7" at 991.67,-711.89 h39.37 r270; Top Overlay "6" at 1037.67,-76.89 h39.37 r270; Top Overlay "1" at 1629.67,-73.22 h39.37 r270